# Altium PCB IoT-Button-PCB-v1.5.PcbDoc
Units mil, origin at the board's own origin, x right, y up, seen from the top; angles counter-clockwise.
Board outline 3543.3 x 3267.72 mil, 2 copper layers (Top Layer, Bottom Layer), stack 46.063 mil thick; 41 components, 21 nets, 170 pads, 0 vias.
Unrouted connection lines stored in the file: 71.
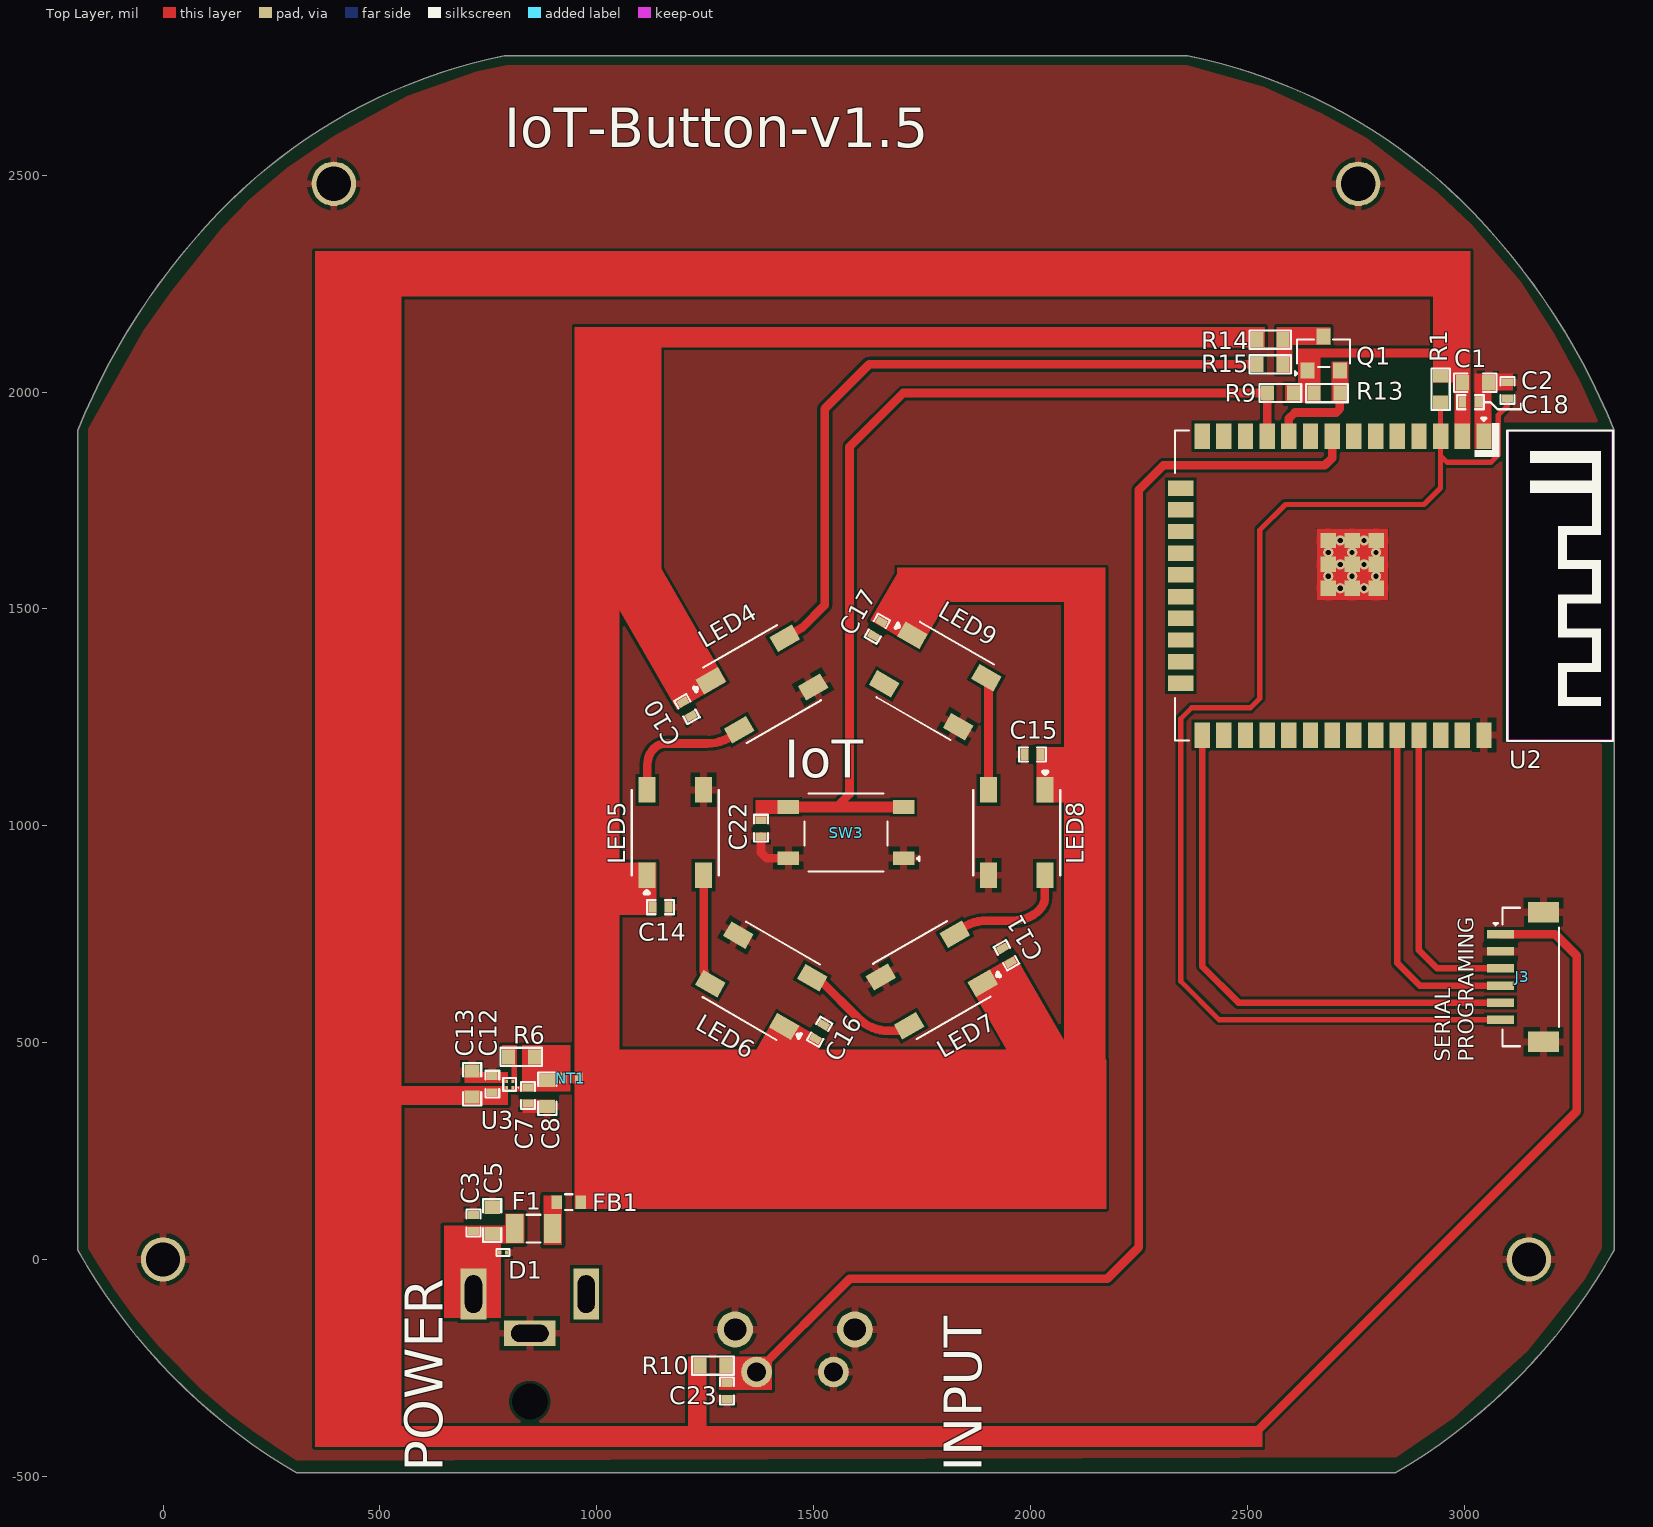
[diagram p0: Top Layer view]
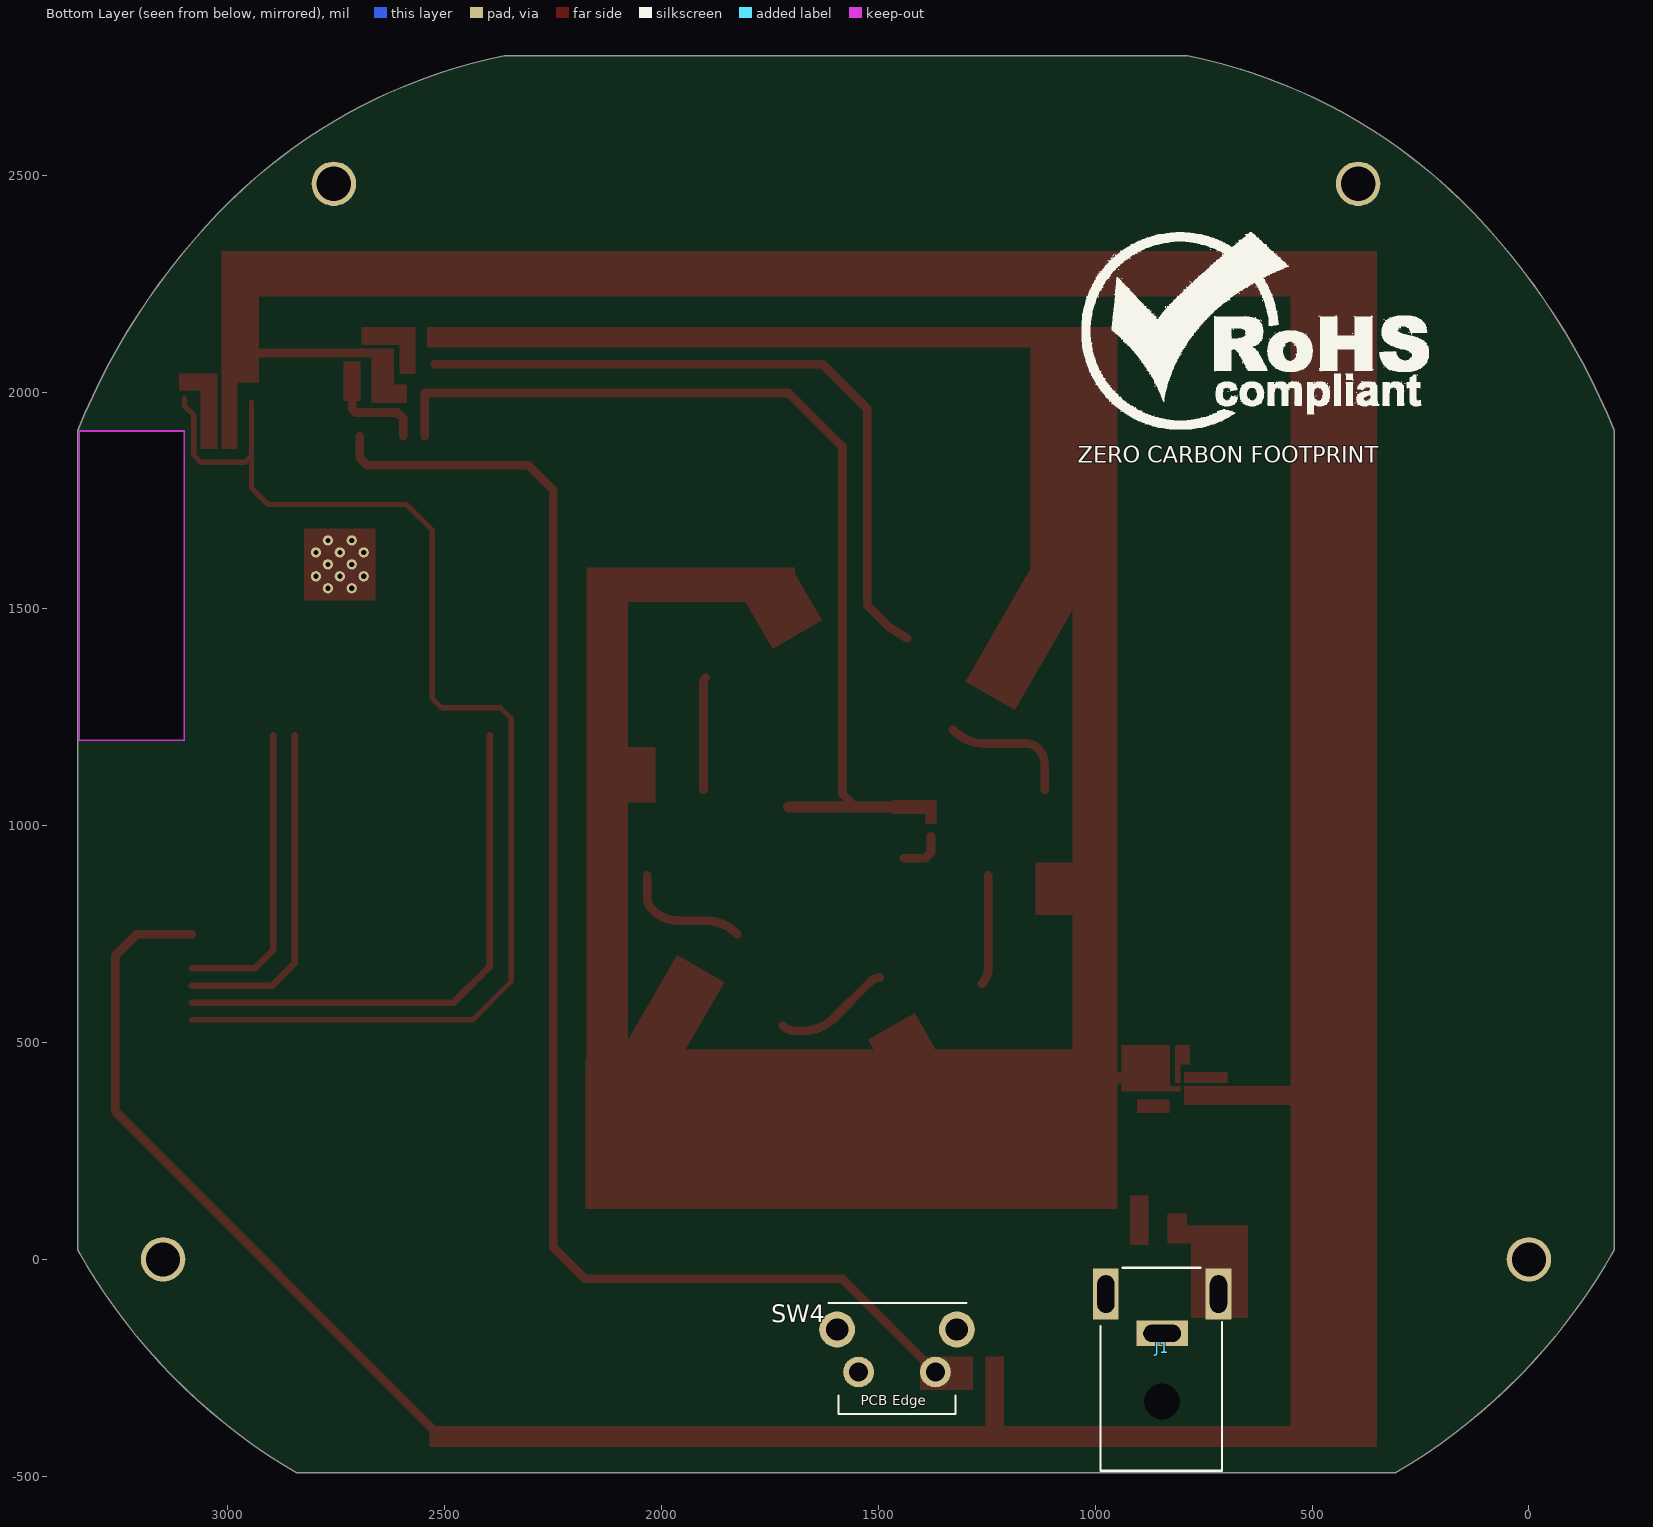
[diagram p1: Bottom Layer view, seen from below]
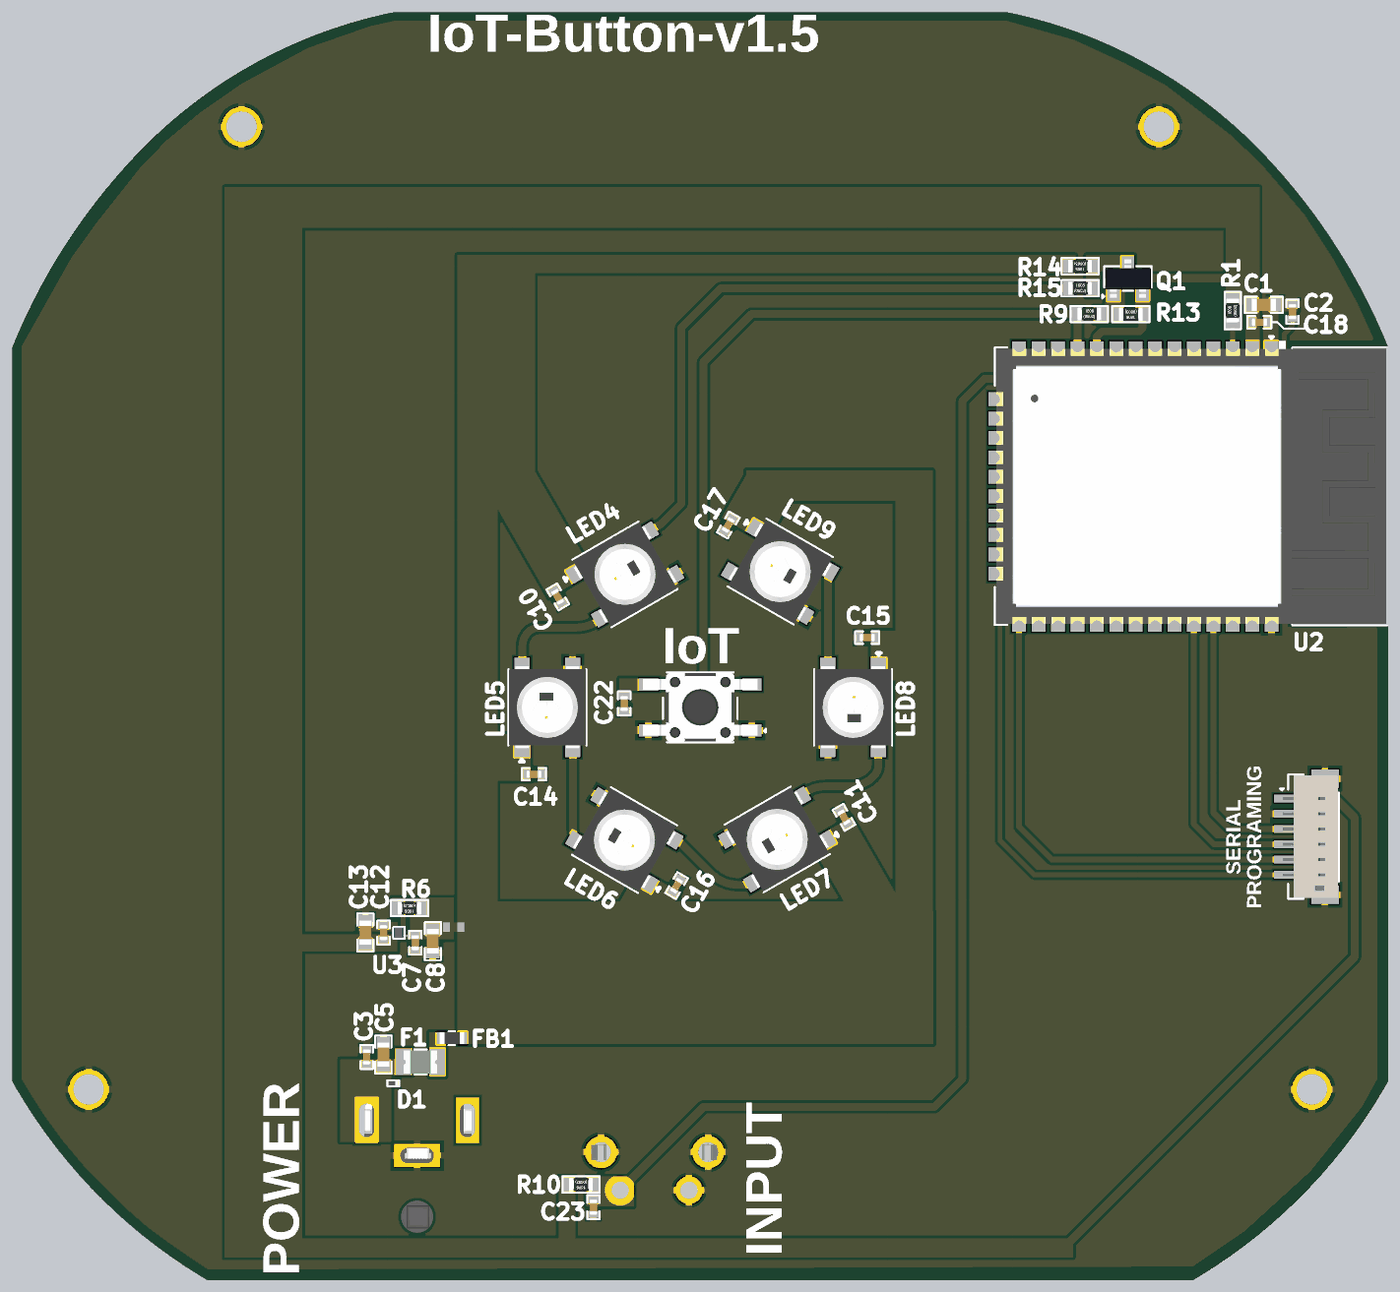
[diagram p2: 3D render of the assembled board from above, using the file's embedded part models]

## Layer stack, top to bottom
Top Solder: solder mask 0.3937, Solder Resist, Dk 3.5
Top Layer: signal copper 1.378
Dielectric 1: dielectric 43.3071, FR-4, Dk 4.8
Bottom Layer: signal copper 1.378
Bottom Solder: solder mask 0.3937, Solder Resist, Dk 3.5

## Board outline
307.28,-492.13 cw(c1004.42,696.47) -196.85,21.41 -196.85,1911.17 cw(c1263.78,1322.48) 127.96,2413.3 cw(c1036.62,1540.64) 787.4,2775.59 2362.2,2775.59 cw(c2112.99,1540.64) 3021.65,2413.3 cw(c1885.82,1322.48) 3346.45,1911.17 3346.46,21.41 cw(c2145.19,696.47) 2842.32,-492.13
cut-out: 3100,1196.74 3100,1910.74 3346.46,1911.17 3346.46,1197.27

## Design rules (kind name [scope] priority, off if disabled: settings)
Clearance [All] p1: gap=7 ignorepadtopadclearanceinfootprint=FALSE
HoleToHoleClearance [All] p1: gap=5 allowstackedmicrovias=TRUE
MinimumSolderMaskSliver [All] p1: minsoldermaskwidth=0
PolygonConnect [All] p1: connectstyle=Relief reliefconductorwidth=17 reliefentries=4 polygonreliefangle="90 Angle" airgapwidth=10
RoutingLayers [All] p1: top layer_v5=TRUE bottom layer_v5=FALSE
RoutingVias [All] p1: holewidth=11.81 width=23.62 viastyle="Through Hole" minholewidth=11.81 minwidth=23.62 maxholewidth=11.81 maxwidth=23.62
SilkToSilkClearance [All] p1: silktosilkclearance=0
SilkToSolderMaskClearance [IsPad] p1: minsilkscreentomaskgap=0 clearancetoexposedcopper=TRUE
SolderMaskExpansion [All] p1: expansion=4 istentingtop=FALSE
UnRoutedNet [All] p1: checkbadconnections=TRUE
Width [All] p1: maxlimit=47.24 minlimit=10 preferedwidth=20 minimp=50.000000 maximp=50.000000 favimp=50.000000
24 further rules are at their usual default settings.

## Classes and differential pairs
component class U_Power-Section: C3 C5 C7 C8 C12 C13 D1 F1 FB1 J1 NT1 R6 U3
component class U_LEDS: C10 C11 C14 C15 C16 C17 LED4 LED5 LED6 LED7 LED8 LED9 Q1 R13 R14 R15
component class U_Controller-Section: C1 C2 C18 C22 C23 J3 R1 R9 R10 SW3 SW4 U2

## Components (designator, comment, footprint, x,y, rotation, side; value= is the part's Value field where it differs from the comment)
C1 "1uF" Cap-0603 3026,2021.5 r180 top
C2 "100nF" Cap-0402 3100,2004 r270 top
C3 "1uF" Cap-0603 759,89.72 r270 top
C5 "100nF" Cap-0402 716,83.72 r270 top
C7 "1uF" Cap-0603 886,382 r90 top
C8 "100nF" Cap-0402 841,377.92 r90 top
C10 "100nF" Cap-0402 1208,1269.02 r120 top
C11 "100nF" Cap-0402 1945,701 r300 top
C12 "100nF" Cap-0402 759.2,404 r270 top
C13 "1uF" Cap-0603 712.5,404 r270 top
C14 "100nF" Cap-0402 1146.83,812 r180 top locked
C15 "100nF" Cap-0402 2004.96,1164 r0 top
C16 "100nF" Cap-0402 1514,524.98 r240 top
C17 "100nF" Cap-0402 1647.14,1454.18 r60 top
C18 "100nF" Cap-0402 3014.5,1976.5 r180 top
C22 "100nF" Cap-0402 1378.94,994.25 r90 top
C23 "100nF" Cap-0402 1299.98,-303.32 r90 top
D1 "PESD5V0H1BSFYL" DSN0603-2 784.13,15.72 r180 top
F1 "BSMD0805L-200" Fuse-0805 854.31,70.72 r0 top
FB1 "BLM18SG121TN1D" "IND-0603 (1608 Metric)" 935.44,132 r180 top
J1 "DC-0360-2.5" DC-0360-2.5 845.7,-170.52 r90 bottom
J3 "Voltlink Target" "Voltlink Target" 3133.77,651.16 r270 top
LED4 "WS2812B-XF02/W" WS2812B-XF02/W 1381.02,1326.96 r30 top
LED5 "WS2812B-XF02/W" WS2812B-XF02/W 1181.1,984.25 r90 top locked
LED6 "WS2812B-XF02/W" WS2812B-XF02/W 1379.57,642.37 r150 top
LED7 "WS2812B-XF02/W" WS2812B-XF02/W 1772.94,644.04 r210 top
LED8 "WS2812B-XF02/W" WS2812B-XF02/W 1968.5,984.25 r270 top locked
LED9 "WS2812B-XF02/W" WS2812B-XF02/W 1780.59,1333.95 r330 top
NT1 "Net Tie_SMD" "Net Tie Pad" 940,418 r180 top net-tie
Q1 "Si2302CDS" Sot-23 2676.12,2088.87 r0 top
R1 "10K" Res-0603 2946,2006.5 r270 top
R6 "10K" Res-0603 826,467 r0 top
R9 "10K" Res-0603 2576.47,1997.75 r180 top
R10 "10K" Res-0603 1267.98,-245 r0 top
R13 "10K" Res-0603 2683.72,1997.5 r0 top
R14 "10K" Res-0603 2553,2121 r0 top
R15 "1K" Res-0603 2553,2064 r180 top
SW3 "GT-TC074E-H080-L1" GT-TC074E-H080-L1 1574.8,984.25 r180 top locked
SW4 "1825027-8" 1825027-8 1457.2,-210.75 r180 bottom
U2 "ESP32-WROOM-32E-N8R2" "38-SMD Module" 2696.39,1553.49 r270 top
U3 "TPS7A2133PYWDJ" "4-WCSP (0.63x0.63)" 798.71,404 r180 top

## Footprints (in the part's own frame and the unit in brackets; to place one, negate y for a bottom-side part, rotate by r counter-clockwise, add the part's x,y. Pads: shape width x height; smd on the part's side, far side on the other; paste and mask are expansions set on the pad)
"4-WCSP (0.63x0.63)" [mm]
  rect 0.165x0.165 smd: A1(-0.192,0.193) A2(0.158,0.193) B1(-0.192,-0.157) B2(0.158,-0.157)
  silkscreen extent -0.54,-0.37 0.36,0.39, body extent -0.32,-0.32 0.32,0.32, height 0.43
"38-SMD Module" [mm]
  rect 1.5x0.9 smd: 1(-8.75,8.88) 2(-8.75,7.61) 3(-8.75,6.34) 4(-8.75,5.07) 5(-8.75,3.8) 6(-8.75,2.53) 7(-8.75,1.26) 8(-8.75,-0.01) 9(-8.75,-1.28) 10(-8.75,-2.55) 11(-8.75,-3.82) 12(-8.75,-5.09) 13(-8.75,-6.36) 14(-8.75,-7.63) 25(8.75,-7.63) 26(8.75,-6.36) 27(8.75,-5.09) 28(8.75,-3.82) 29(8.75,-2.55) 30(8.75,-1.28) 31(8.75,-0.01) 32(8.75,1.26) 33(8.75,2.53) 34(8.75,3.8) 35(8.75,5.07) 36(8.75,6.34) 37(8.75,7.61) 38(8.75,8.88)
  rect 0.9x1.5 smd: 15(-5.71,-8.88) 16(-4.44,-8.88) 17(-3.17,-8.88) 18(-1.9,-8.88) 19(-0.63,-8.88) 20(0.64,-8.88) 21(1.91,-8.88) 22(3.18,-8.88) 23(4.45,-8.88) 24(5.72,-8.88)
  rect 0.9x0.9 smd: 39(-2.65,2.56) 40(-1.25,2.56) 41(0.15,2.56) 42(-2.65,1.16) 43(-1.25,1.16) 44(0.15,1.16) 45(-2.65,-0.24) 46(-1.25,-0.24) 47(0.15,-0.24)
  round 0.6 hole 0.3 mask+0: 39_10(-1.95,2.56) 39_11(-0.55,2.56) 39_12(-2.65,1.86) 39_13(-1.25,1.86) 39_14(0.15,1.86) 39_15(-1.95,1.16) 39_16(-0.55,1.16) 39_17(-2.65,0.46) 39_18(-1.25,0.46) 39_19(0.15,0.46) 39_20(-1.95,-0.24) 39_21(-0.55,-0.24)
  Keep-Out Layer region: -9.043,10.287 9.042,10.287 9.042,16.383 -9.043,16.383
  silkscreen extent -9.8,-9.22 9.09,16.43, body extent -9,-9.12 9,16.38, height 3.25
1825027-8 [mm]
  round 1.8 hole 1.1: 1(-2.25,-1.245) 2(2.25,-1.245)
  round 2.1 hole 1.3: 3(3.505,1.245) 4(-3.505,1.245)
  silkscreen extent -4.01,-3.71 4.06,2.79, body extent -4.18,-7.11 4.23,2.73, height 8
Cap-0402 [mil]
  rect 18x25 smd mask+2.36: 1(-18.5,0) 2(18.5,0)
  silkscreen extent -31,-16 31,16, body extent -20,-10 20,10, height 19
Cap-0603 [mil]
  rect 30x35 smd mask+2.36: 1(-30,0) 2(30,0)
  silkscreen extent -49,-21 49,21, body extent -32,-16 31,16, height 34
DC-0360-2.5 [mm]
  rect 1.5x3 hole 1 slot 2.2 at 90 deg mask+0.05: 2(0,0)
  rect 3x1.5 hole 1 slot 2.2 at 0 deg mask+0.05: 3(2.3,3.3) 4(2.3,-3.3)
  round 0 hole 2.1 unplated mask+0.05: MH(-4,0)
  silkscreen extent -8.05,-3.51 3.84,3.61, body extent -8.01,-3.45 3.79,3.56, height 9.65
DSN0603-2 [mm]
  rect 0.2x0.24 smd mask+0.055: 1(-0.2,0) 2(0.2,0)
  silkscreen extent -0.38,-0.2 0.38,0.2, body extent -0.3,-0.15 0.3,0.15, height 0.32
Fuse-0805 [mm]
  rect 1x1.7 smd: 1(-1.1,0) 2(1.1,0)
  silkscreen extent -0.41,-0.81 0.41,0.81, body extent -1.1,-0.75 1.1,0.75, height 1.24
GT-TC074E-H080-L1 [mm]
  rect 1.25x0.8 smd: 1(-3.375,1.5) 2(3.375,1.5) 3(-3.375,-1.5) 4(3.375,-1.5)
  silkscreen extent -4.29,-2.29 2.44,2.29, body extent -3.75,-2.25 3.75,2.25, height 8
"IND-0603 (1608 Metric)" [mm] "0.063\" L x 0.032\" W (1.60mm x 0.80mm)"
  rect 0.6x0.8 smd: 1(-0.7,0) 2(0.7,0)
  silkscreen extent -0.2,-0.46 0.23,0.46, body extent -0.8,-0.4 0.8,0.4, height 0.78
"Net Tie Pad" [mil]
  rect 18x25 smd mask-10: 1(-18.5,0) 2(18.5,0)
  Top Layer region: -14.97,-12.5 15.03,-12.5 15.03,12.5 -14.97,12.5
Res-0603 [mil]
  rect 30x35 smd: 1(-30,0) 2(30,0)
  silkscreen extent -48,-21 48,21, body extent -31,-17 31,17, height 18
Sot-23 [mm] "TRANS NPN 40V 0.6A SOT23"
  rect 0.82x0.92 smd: 1(-0.95,-1) 2(0.95,-1) 3(0,1)
  silkscreen extent -1.68,-1.3 1.55,0.81, body extent -1.5,-1.25 1.5,1.25, height 1.05
"Voltlink Target" [mm]
  rect 0.5x1.6 smd: 1(-2.5,-1.262) 2(-1.5,-1.262) 3(-0.5,-1.262) 4(0.5,-1.262) 5(1.5,-1.262) 6(2.5,-1.262)
  rect 1.2x1.8 smd: MP1(-3.8,1.262) MP2(3.8,1.262)
  silkscreen extent -4.06,-1.68 4.06,2.17, body extent -4,-1.49 4,2.11, height 4.25
WS2812B-XF02/W [mm]
  rect 1.5x1 smd: 1(-2.5,1.65) 2(-2.5,-1.65) 3(2.5,-1.65) 4(2.5,1.65)
  silkscreen extent -3.56,-2.55 2.5,2.55, body extent -2.7,-2.5 2.7,2.5, height 1.55

## Part data
C1 C3 C7 C13: library part CC0603KRX5R8BB105, "CAP CER 1UF 25V X5R 0603", Case Code (Imperial)=0603, Case Code (Metric)=1608, Dielectric=X5R, LCSC Part Number=C14664, Manufacturer=Yageo, Max Operating Temperature=85°C, Min Operating Temperature=-55°C, Package Quantity=1, Supplier Part Number 1=311-1445-1-ND, Tolerance=10%, Voltage Rating=25V, Capacitance=1uF, Case/Package=0603, Category="Ceramic Capacitors", ComponentLink1Description=https://datasheet.ciiva.com/176/mlccorderingcode-176785.pdf?src-supplier=Digi-Key, ComponentLink1URL=https://datasheet.ciiva.com/176/mlccorderingcode-176785.pdf?src-supplier=Digi-Key, ComponentLink2Description=https://datasheet.ciiva.com/176/mlccorderingcode-176786.pdf?src-supplier=Digi-Key, ComponentLink2URL=https://datasheet.ciiva.com/176/mlccorderingcode-176786.pdf?src-supplier=Digi-Key, ComponentLink3Description=https://datasheet.ciiva.com/176/mlccorderingcode-176787.pdf?src-supplier=Digi-Key, ComponentLink3URL=https://datasheet.ciiva.com/176/mlccorderingcode-176787.pdf?src-supplier=Digi-Key, ComponentLink4Description=https://datasheet.ciiva.com/17436/upy-gphc-x5r-4v-to-50v-12-17436952.pdf?src-supplier=Avnet+Europe, ComponentLink4URL=https://datasheet.ciiva.com/17436/upy-gphc-x5r-4v-to-50v-12-17436952.pdf?src-supplier=Avnet+Europe, ComponentLink5Description=https://datasheet.ciiva.com/7978/1525783-7978171.pdf?src-supplier=Element14, ComponentLink5URL=https://datasheet.ciiva.com/7978/1525783-7978171.pdf?src-supplier=Element14, ComponentLink6Description=https://datasheet.ciiva.com/11586/upy-gphc-x5r-4v-to-50v-12-11586318.pdf?src-supplier=Avnet, ComponentLink6URL=https://datasheet.ciiva.com/11586/upy-gphc-x5r-4v-to-50v-12-11586318.pdf?src-supplier=Avnet, Construction=Flat, Depth=0.8mm, Halogen Free="Halogen Free", Height=0.8mm, Lead Free="Lead Free", Length=1.6mm, Manufacturer Part Number=CC0603KRX5R8BB105, Mount="Surface Mount", Number of Pins=2, Packaging="Tape and Reel", Pricing 1="1=0.12000, 10=0.08400, 50=0.04760, 100=0.03940, 500=0.02764, 1000=0.02288 (USD)", Radiation Hardening=No, REACH SVHC="No SVHC", RoHS=Yes, RoHS Compliant=Yes, Series=CC, Stock 1=919939, Supplier 1=Digi-Key, Termination=SMD/SMT, Thickness=0.035inch, Voltage Rating (DC)=25V, Width=0.031inch
  C3 C7 C13: Item Type=Capacitor
C2 C5 C8 C10 C11 C12 C14 C15 C16 C17 C18 C22 C23: library part CC0402KRX5R8BB104, "CAP CER 0.1UF 25V X5R 0402", Case Code (Imperial)=0402, Case Code (Metric)=1005, Dielectric=X5R, LCSC Part Number=C106256, Manufacturer=Yageo, Max Operating Temperature=85°C, Min Operating Temperature=-55°C, Resistor Type=Ceramic, Supplier Part Number 1=311-1697-1-ND, Tolerance=10%, Voltage Rating=25V, Capacitance=100nF, Case/Package=0402, Category="Ceramic Capacitors", ComponentLink1Description=http://www.mouser.com/ds/2/447/UPY-GPHC_X5R_4V-to-50V_25-1131599.pdf?src-supplier=Mouser, ComponentLink1URL=http://www.mouser.com/ds/2/447/UPY-GPHC_X5R_4V-to-50V_25-1131599.pdf?src-supplier=Mouser, ComponentLink2Description=http://www.yageo.com/documents/recent/UPY-GPHC_X5R_4V-to-50V-16.pdf?src-supplier=Future+Electronics, ComponentLink2URL=http://www.yageo.com/documents/recent/UPY-GPHC_X5R_4V-to-50V-16.pdf?src-supplier=Future+Electronics, ComponentLink3Description=http://www.yageo.com/documents/recent/UPY-GPHC_X5R_4V-to-50V_25.pdf?src-supplier=Digi-Key, ComponentLink3URL=http://www.yageo.com/documents/recent/UPY-GPHC_X5R_4V-to-50V_25.pdf?src-supplier=Digi-Key, Depth=0.5mm, Halogen Free="Halogen Free", Item Type=Capacitor, Lead Free="Lead Free", Length=0.039inch, Manufacturer Part Number=CC0402KRX5R8BB104, Mount="Surface Mount", Packaging="Tape and Reel", Pricing 1="1=0.10000, 10=0.03800, 50=0.02100, 100=0.01710, 500=0.01224, 1000=0.00961, 2500=0.00874, 5000=0.00804 (USD)", RoHS=Yes, RoHS Compliant=Yes, Series=CC, Stock 1=4598218, Supplier 1=Digi-Key, Thickness=0.022inch, Voltage Rating (DC)=25V, Width=0.02inch
D1: "TVS DIODE 5VWM 6.3VC DSN0603-2", LCSC Part Number=C477989, Manufacturer=Nexperia, Category="ESD and Circuit Protection ICs", ComponentLink1Description=http://www.farnell.com/datasheets/1961312.pdf?src-supplier=Farnell, ComponentLink1URL=http://www.farnell.com/datasheets/1961312.pdf?src-supplier=Farnell, ComponentLink2Description=https://assets.nexperia.com/documents/data-sheet/PESD5V0H1BSF.pdf?src-supplier=Digi-Key, ComponentLink2URL=https://assets.nexperia.com/documents/data-sheet/PESD5V0H1BSF.pdf?src-supplier=Digi-Key, ComponentLink3Description=http://www.farnell.com/datasheets/1961312.pdf?src-supplier=Newark, ComponentLink3URL=http://www.farnell.com/datasheets/1961312.pdf?src-supplier=Newark, Item Type=Diode, Manufacturer Part Number=PESD5V0H1BSFYL, Pricing 1="18000=0.06453, 36000=0.06278, 54000=0.06104, 90000=0.05930, 180000=0.05755, 900000=0.05581, 1800000=0.05406 (USD)", RoHS=Yes, RoHS Compliant=Yes, Stock 1=9000, Supplier 1=Avnet, Supplier Part Number 1=PESD5V0H1BSFYL
F1: "6V 2A 50A 1W -40℃~+85℃ 4A 4mΩ 5s 45mΩ 0805 Resettable Fuses ROHS", LCSC Part Number=C2757931, Manufacturer=BHFUSE, Package=0805, ComponentLink1Description=LCSC, ComponentLink1URL=https://www.lcsc.com/product-detail/Resettable-Fuses_BHFUSE-BSMD0805L-200_C2757931.html, Item Type=Fuse, Manufacturer Part Number=BSMD0805L-200
FB1: "FERRITE BEAD 120 OHM 0603 1LN", Case Code (Imperial)=0603, Case Code (Metric)=1608, Current Rating=3A, DC Resistance (DCR)=25mR, Frequency=100MHz, LCSC Part Number=C113030, Manufacturer=Murata, Max Operating Temperature=125°C, Min Operating Temperature=-55°C, Package Quantity=1, Tolerance=25%, Case/Package=0603, Category="Ferrite Beads and Chips", ComponentLink1Description=https://datasheet.ciiva.com/1012/l0110s0100blm18s-1012624.pdf?src-supplier=Digi-Key, ComponentLink1URL=https://datasheet.ciiva.com/1012/l0110s0100blm18s-1012624.pdf?src-supplier=Digi-Key, ComponentLink2Description=https://datasheet.ciiva.com/11799/0900766b811b5866-11799181.pdf?src-supplier=RSComponents, ComponentLink2URL=https://datasheet.ciiva.com/11799/0900766b811b5866-11799181.pdf?src-supplier=RSComponents, ComponentLink3Description=https://datasheet.ciiva.com/18093/getdatasheetpartid-295885-18093249.pdf?src-supplier=Verical, ComponentLink3URL=https://datasheet.ciiva.com/18093/getdatasheetpartid-295885-18093249.pdf?src-supplier=Verical, ComponentLink4Description=https://datasheet.ciiva.com/41449/001171723-da-01-en-chip-drossel0603-120r-3000ma-1-6x0-8mm-41449353.pdf?src-supplier=Conrad, ComponentLink4URL=https://datasheet.ciiva.com/41449/001171723-da-01-en-chip-drossel0603-120r-3000ma-1-6x0-8mm-41449353.pdf?src-supplier=Conrad, ComponentLink5Description=https://datasheet.ciiva.com/41449/001172312-da-01-en-drossel-0603-120r-1-6x0-8mm-10000st-41449675.pdf?src-supplier=Conrad, ComponentLink5URL=https://datasheet.ciiva.com/41449/001172312-da-01-en-drossel-0603-120r-1-6x0-8mm-10000st-41449675.pdf?src-supplier=Conrad, ComponentLink6Description=https://datasheet.ciiva.com/8021/5151-8021511.pdf?src-supplier=Element14, ComponentLink6URL=https://datasheet.ciiva.com/8021/5151-8021511.pdf?src-supplier=Element14, ComponentLink7Description=https://datasheet.ciiva.com/8021/5151-8021512.pdf?src-supplier=Element14, ComponentLink7URL=https://datasheet.ciiva.com/8021/5151-8021512.pdf?src-supplier=Element14, ComponentLink8Description=https://datasheet.ciiva.com/14122/blm-series-eng-tds-14122906.pdf?src-supplier=Distrelec, ComponentLink8URL=https://datasheet.ciiva.com/14122/blm-series-eng-tds-14122906.pdf?src-supplier=Distrelec, ComponentLink9Description=https://datasheet.ciiva.com/1012/l0110s0100blm18s-1012623.pdf?src-supplier=Digi-Key, ComponentLink9URL=https://datasheet.ciiva.com/1012/l0110s0100blm18s-1012623.pdf?src-supplier=Digi-Key, ComponentLink10Description=https://datasheet.ciiva.com/1012/l0110s0100blm18s-1012625.pdf?src-supplier=Digi-Key, ComponentLink10URL=https://datasheet.ciiva.com/1012/l0110s0100blm18s-1012625.pdf?src-supplier=Digi-Key, ComponentLink11Description=https://datasheet.ciiva.com/16395/l0110s0100blm18s-16395498.pdf?src-supplier=Future+Electronics, ComponentLink11URL=https://datasheet.ciiva.com/16395/l0110s0100blm18s-16395498.pdf?src-supplier=Future+Electronics, Core Material=Ferrite, DC Resistance-Max=25mR, Depth=0.8mm, Height=0.8mm, Impedance=120R, Item Type="Ferrite Bead", Lead Free="Lead Free", Length=1.6mm, Manufacturer Part Number=BLM18SG121TN1D, Material=Steel,Ferrite, Max Current Rating=3A, Max DC Current=3A, Number of Circuits=1, Number of Lines=1, Number of Pins=2, Packaging="Tape and Reel", Pricing 1="1=0.12640, 10=0.08350, 25=0.07210, 100=0.05150, 250=0.04730, 500=0.04110, 1000=0.03420, 3000=0.03360, 6000=0.03320, 15000=0.03270, 30000=0.03200, 75000=0.03150 (USD)", Reach SVHC Compliant=Yes, RoHS=Yes, RoHS Compliant=Yes, Series=BLM18S, Shielding=Unshielded, Stock 1=82612, Supplier 1="Arrow Electronics", Supplier Part Number 1=BLM18SG121TN1D, Termination=SMD/SMT, Test Frequency=100MHz, Width=0.8mm
J1: "DC Power Receptacle 260℃ Brass -20℃~+70℃ 2.5mm 6mm 2.5A 24V Plugin AC/DC Power Connectors ROHS", LCSC Part Number=C319122, Manufacturer="XKB Connectivity", Package=Plugin, ComponentLink1Description=LCSC, ComponentLink1URL=https://www.lcsc.com/product-detail/AC-DC-Power-Connectors_XKB-Connectivity-DC-0360-2-5_C319122.html, Item Type="DC Jack", Manufacturer Part Number=DC-0360-2.5
J3: library part C145963, "1x6P SH 1 1mm 6 SMD,P=1mm Wire To Board / Wire To Wire Connector ROHS", Manufacturer=BOOMELE, Package=SMD,P=1mm, ComponentLink1Description=LCSC, ComponentLink1URL=https://www.lcsc.com/product-detail/Wire-To-Board-Wire-To-Wire-Connector_BOOMELE-Boom-Precision-Elec-C145963_C145963.html, Item Type=Connector, LCSC Part Number=C145963, Manufacturer Part Number=C145963
LED4 LED5 LED6 LED7 LED8 LED9: "SMD5050 Light Emitting Diodes (LED) ROHS", LCSC Part Number=C4154882, Manufacturer=Worldsemi, Package=SMD5050, ComponentLink1Description=LCSC, ComponentLink1URL=https://www.lcsc.com/product-detail/Light-Emitting-Diodes-LED_Worldsemi-WS2812B-XF02-W_C4154882.html, Item Type="RGB LED", Manufacturer Part Number=WS2812B-XF02/W
NT1: "Net Tie SMD", Manufacturer Part Number="Net Tie", Item Type="Net Tie Pad"
Q1: "N-CHANNEL 20-V (D-S) MOSFET", LCSC Part Number=C5310968, Manufacturer="TECH PUBLIC", Manufacturer Part Number=SI2302CDS, Package=SOT-23, ComponentLink1Description=LCSC, ComponentLink1URL=https://www.lcsc.com/product-detail/MOSFETs_TECH-PUBLIC-SI2302CDS_C5310968.html, Item Type=Mosfet
R1 R6 R9 R10 R13 R14: library part RC0603FR-0710KL, "RES SMD 10K Ohm 1% 1/10W 0603", Case Code (Imperial)=0603, Case Code (Metric)=1608, LCSC Part Number=C98220, Manufacturer=Yageo, Max Operating Temperature=155°C, Max Power Dissipation=100mW, Min Operating Temperature=-55°C, Resistance=10kR, Resistance Tolerance=1%, Resistor Type="Thick Film", Supplier Part Number 1=311-10.0KHRCT-ND, Temperature Coefficient=100ppm/°C, Voltage Rating=75V, Voltage Rating (DC)=50V, Case/Package=0603, Category="Chip SMD Resistors", ComponentLink1Description=https://datasheet.ciiva.com/7660/38590-7660789.pdf?src-supplier=Element14, ComponentLink1URL=https://datasheet.ciiva.com/7660/38590-7660789.pdf?src-supplier=Element14, ComponentLink2Description=https://datasheet.ciiva.com/7983/443971-7983596.pdf?src-supplier=Element14, ComponentLink2URL=https://datasheet.ciiva.com/7983/443971-7983596.pdf?src-supplier=Element14, ComponentLink3Description=https://datasheet.ciiva.com/22747/443971-22747519.pdf?src-supplier=Element14, ComponentLink3URL=https://datasheet.ciiva.com/22747/443971-22747519.pdf?src-supplier=Element14, ComponentLink4Description=https://datasheet.ciiva.com/46440/1868787-46440891.pdf?src-supplier=Element14, ComponentLink4URL=https://datasheet.ciiva.com/46440/1868787-46440891.pdf?src-supplier=Element14, ComponentLink5Description=https://datasheet.ciiva.com/7746/1738695-7746239.pdf?src-supplier=Element14, ComponentLink5URL=https://datasheet.ciiva.com/7746/1738695-7746239.pdf?src-supplier=Element14, ComponentLink6Description=https://datasheet.ciiva.com/15189/getdatasheetpartid-409289-15189591.pdf?src-supplier=Verical, ComponentLink6URL=https://datasheet.ciiva.com/15189/getdatasheetpartid-409289-15189591.pdf?src-supplier=Verical, Construction=Rectangular, Depth=0.8mm, Features="Moisture Resistant", Height=0.45mm, Item Type=Resistor, Lead Free="Lead Free", Lead Pitch=0.3mm, Length=1.6mm, Manufacturer Part Number=RC0603FR-0710KL, Military Standard=Not, Number of Pins=2, Number of Terminations=2, Packaging="Tape and Reel", Power Rating=100mW, Pricing 1="1=0.10000, 10=0.02400, 100=0.00970, 1000=0.00436, 2500=0.00378 (USD)", REACH SVHC=Unknown, RoHS=Yes, RoHS Compliant=Yes, Series=RC, Size Code=0603, Stock 1=25249139, Supplier 1=Digi-Key, Termination=SMD/SMT, Tolerance=1%, Weight=7.1E-05oz, Width=0.8mm
R15: library part RC0603FR-071KL, "RES SMD 1K OHM 1% 1/10W 0603", Case Code (Imperial)=0603, Case Code (Metric)=1608, LCSC Part Number=C22548, Manufacturer=Yageo, Max Operating Temperature=155°C, Min Operating Temperature=-55°C, Power Rating=100mW, Resistance=1kR, Supplier Part Number 1=311-1.00KHRDKR-ND, Temperature Coefficient=100ppm/°C, Tolerance=1%, Voltage Rating=50V, Case/Package=0603, ComponentLink1Description=https://www.verical.com/server-webapp/html/getDatasheet?partID=409289&src-supplier=Verical, ComponentLink1URL=https://www.verical.com/server-webapp/html/getDatasheet?partID=409289&src-supplier=Verical, ComponentLink2Description=http://documents.rs-components.com/techlib://itc_doclist_GB.htm?stockno=5048928&src-supplier=RSComponents, ComponentLink2URL=http://documents.rs-components.com/techlib://itc_doclist_GB.htm?stockno=5048928&src-supplier=RSComponents, ComponentLink3Description=http://www.yageo.com/documents/recent/PYu-RC0603_51_RoHS_L_4.pdf?src-supplier=Avnet+Europe, ComponentLink3URL=http://www.yageo.com/documents/recent/PYu-RC0603_51_RoHS_L_4.pdf?src-supplier=Avnet+Europe, ComponentLink4Description=http://www.farnell.com/datasheets/2167052.pdf?src-supplier=Element14, ComponentLink4URL=http://www.farnell.com/datasheets/2167052.pdf?src-supplier=Element14, ComponentLink5Description=http://www.farnell.com/datasheets/1868787.pdf?src-supplier=Element14, ComponentLink5URL=http://www.farnell.com/datasheets/1868787.pdf?src-supplier=Element14, ComponentLink6Description=http://www.yageo.com/documents/recent/PYu-RC_Group_51_RoHS_L_2.pdf?src-supplier=Avnet, ComponentLink6URL=http://www.yageo.com/documents/recent/PYu-RC_Group_51_RoHS_L_2.pdf?src-supplier=Avnet, ComponentLink7Description=https://www.verical.com/server-webapp/html/getDatasheet?partID=404327&src-supplier=Verical, ComponentLink7URL=https://www.verical.com/server-webapp/html/getDatasheet?partID=404327&src-supplier=Verical, ComponentLink8Description=http://www.farnell.com/datasheets/443971.pdf?src-supplier=Element14, ComponentLink8URL=http://www.farnell.com/datasheets/443971.pdf?src-supplier=Element14, Composition="Thick Film", Contact Plating=Tin,Matte, Depth=0.8mm, Height=0.45mm, Item Type=Resistor, Lead Free="Lead Free", Length=1.6mm, Manufacturer Part Number=RC0603FR-071KL, Military Standard=Not, Packaging="Tape and Reel", Pricing 1="1=0.1, 10=0.023, 100=0.0094, 1000=0.0042, 2500=0.0037 (USD)", Radiation Hardening=No, REACH SVHC="No SVHC", Stock 1=21472395, Supplier 1=Digi-Key, Termination=SMD/SMT
SW3: "No NO 50mA 100MΩ 100000 Times 12V 130gf@±30gf Brick nogging SPST SMD Tactile Switches ROHS", LCSC Part Number=C963229, Manufacturer=G-Switch, Package=SMD, ComponentLink1Description=LCSC, ComponentLink1URL=https://www.lcsc.com/product-detail/Tactile-Switches_G-Switch-GT-TC074E-H080-L1_C963229.html, Item Type="Tactile Switch", Manufacturer Part Number=GT-TC074E-H080-L1
SW4: "50mA Lying SPST 24V Plugin Tactile Switches ROHS", Manufacturer="TE Connectivity", Category="Pushbutton Switches", ComponentLink1Description=https://datasheet.ciiva.com/30072/eng-cd-1825027-f-30072833.pdf?src-supplier=Onlinecomponents.com, ComponentLink1URL=https://datasheet.ciiva.com/30072/eng-cd-1825027-f-30072833.pdf?src-supplier=Onlinecomponents.com, ComponentLink2Description=https://datasheet.ciiva.com/16393/1825027-8-16393346.pdf?src-supplier=Future+Electronics, ComponentLink2URL=https://datasheet.ciiva.com/16393/1825027-8-16393346.pdf?src-supplier=Future+Electronics, ComponentLink3Description=https://datasheet.ciiva.com/8164/eng-cd-1825027-g4-8164921.pdf?src-supplier=Avnet, ComponentLink3URL=https://datasheet.ciiva.com/8164/eng-cd-1825027-g4-8164921.pdf?src-supplier=Avnet, Manufacturer Part Number=1825027-8, Pricing 1="1=0.13800, 10=0.13370, 25=0.12590, 100=0.10940, 250=0.10570, 500=0.09520, 1000=0.07320, 2500=0.07250, 5000=0.06250 (USD)", RoHS=Yes, Stock 1=178529, Supplier 1="Arrow Electronics", Supplier Part Number 1=1825027-8
U2: "RF TXRX MODULE BT PCB TRACE SMD", LCSC Part Number=C5361945, Manufacturer="Espressif Systems", Supplier Part Number=1965-ESP32-WROOM-32E-N8R2DKR-ND, Category=Uncategorized, Item Type=Module, Manufacturer Part Number=ESP32-WROOM-32E-N8R2, Pricing="1=2.88 (USD)", RoHS=No, Supplier=Digikey
U3: "500-MA, LOW-NOISE, LOW-IQ, HIGH", LCSC Part Number=C3019997, Manufacturer="Texas Instruments", Package=Custom, ComponentLink1Description=LCSC, ComponentLink1URL=https://www.lcsc.com/product-detail/Linear-Voltage-Regulators-LDO_Texas-Instruments-TPS7A2133PYWDJ_C3019997.html, Item Type=IC, Manufacturer Part Number=TPS7A2133PYWDJ

## Free pads (board coordinates)
  round 102.36 hole 78.74 mask+1.97: MH(0,0) MH(393.7,2480.32) MH(2755.91,2480.32) MH(3149.61,0)

## Nets (pads, with @x,y where several pads share a name; then routed paths per layer and width w, separated by ;. In a path a pad name is that pad's centre, name@x,y a point inside that pad or via, vN(x,y) a via of type N, cw(c..) or ccw(c..) an arc to the next point about the centre after c; other vN are vias at no path point)
3.3V: C1.2 C12.2 C13.2 C18.2 J3.1 Q1.1 R1.1 R9.1 R10.1 R13.1 U2.2 U3.A2 | length 1729.6
  Top Layer w20: 1210,-415 1239.9,-415 ; 1239.9,-410.92 1243.98,-415 ; 2510.38,-408.38 3260,341.25 3260,700 3210.42,749.58 J3.1 ; U2.2 C18.2
5VCC: C10.2 C11.2 C14.2 C15.2 C16.2 C17.2 FB1.1 LED4.1 LED5.1 LED6.1 LED7.1 LED8.1 LED9.1 NT1.1 R14.1 | length 7.1
  Top Layer w20: 2121,842 2125,838 ; 2121,2122 2122,2121
5VIN: C3.2 C5.2 D1.2 F1.1 J1.4
BUTTON: C23.2 R10.2 SW4.2 U2.8 | length 3273.4
  Top Layer w20: SW4.2 1583.39,-45 2177.39,-45 2250,27.61 2250,1774 2307,1831 2679,1831 2696,1848 U2.8
DIN: Q1.2 R13.2 U2.10 | length 203.9
  Top Layer w20: U2.10 2596,1939 2610,1953 2705,1953 2713.72,1961.72 R13.2
DIN#: LED4.4 R15.2 | length 1612.7
  Top Layer w20: LED4.4 1450.26,1442.94 1473.17,1456.16 1526,1508.99 1526,1961.57 1628.43,2064 R15.2
DOUT1: LED4.2 LED5.4 | length 307.6
  Top Layer w20: LED5.4@1116.83,1082.68 1116.83,1141.38 cw(c1168.62,1141.38) 1132,1178 cw(c1160.2,1149.8) 1160.2,1189.68 1255.03,1189.68 ccw(c1255.03,1289.68) 1325.74,1218.97 LED4.2
DOUT2: LED5.2 LED6.4 | length 254.5
  Top Layer w20: LED5.2@1246.75,885.83 1246.75,671.77 ccw(c1298.29,671.77) LED6.4
DOUT3: LED6.2 LED7.4 | length 271.1
  Top Layer w20: LED6.2 cw(c1497.28,619.72) 1518.28,640.72 1602.75,556.25 ccw(c1673.46,626.96) 1673.46,526.96 1692.14,526.96 ccw(c1692.14,566.62) LED7.4
DOUT4: LED7.2 LED8.4 | length 293.9
  Top Layer w20: LED7.2 1827.9,751.71 cw(c1898.61,681) 1898.61,781 1960.64,781 ccw(c1960.64,866.36) 2021,806 ccw(c1990.91,836.09) 2033.46,836.09 LED8.4
DOUT5: LED8.2 LED9.4 | length 259.7
  Top Layer w20: LED9.4 cw(c1885.67,1328.36) 1903.54,1328.36 LED8.2
EN: C2.2 J3.6 R1.2 U2.3 | length 2909.6
  Top Layer w12: R1.2 U2.3 2946,1852.82 ; J3.6 2435.27,552.73 2346.79,641.21 2346.79,1246.8 2371.99,1272 2507.43,1272 2529,1293.57 2529,1682 2588,1741 2907.96,1741 2946,1779.04 2946,1852.82 ; C2.2 3100,1968 3079,1947 3079,1855 3062,1838 2960.82,1838 2946,1852.82
GND: C1.1 C2.1 C3.1 C5.1 C7.1 C8.1 C10.1 C11.1 C12.1 C13.1 C14.1 C15.1 C16.1 C17.1 C18.1 C22.1 C23.1 D1.1 J1.2 J3.2 J3.MP1 J3.MP2 LED4.3 LED5.3 LED6.3 LED7.3 LED8.3 LED9.3 pad.MH SW3.1 SW3.2 SW4.1 SW4.3 SW4.4 U2.1 U2.38 U2.39 U2.39_10 U2.39_11 U2.39_12 U2.39_13 U2.39_14 U2.39_15 U2.39_16 U2.39_17 U2.39_18 U2.39_19 U2.39_20 U2.39_21 U2.40 U2.41 U2.42 U2.43 U2.44 U2.45 U2.46 U2.47 U3.B2 | length 245.4
  Top Layer w10: U2.1 3046,1963.5 C18.1 3033,1998.5 C1.1
  Top Layer w20: C22.1 1378.94,938.77 cw(c1377.17,938.77) 1378.42,937.52 1379.4,937.52 1391.72,925.2 SW3.2
IO0: J3.5 U2.25 | length 1255.8
  Top Layer w15: U2.25 2396,1161 2396,676 2479.9,592.1 J3.5
IOT_BUT: C22.2 R9.2 SW3.3 SW3.4 U2.11 | length 2223.4
  Top Layer w20: 1553,1043.31 1583,1073.31 1583,1873.75 1707,1997.75 R9.2 2546.47,1898.45 U2.11
  Top Layer w25: SW3.4 1553,1043.31 SW3.3
NetF1_2: F1.2 FB1.2
NetQ1_3: Q1.3 R14.2 R15.1
NetR6_1: R6.1 U3.B1
RXD: J3.4 U2.34 | length 785.2
  Top Layer w15: U2.34 2846,683.29 2897.82,631.47 J3.4
TXD: J3.3 U2.35 | length 701.5
  Top Layer w15: U2.35 2896,713 2938.16,670.84 2977.51,670.84 2992.01,670.84 J3.3
VIN: C7.2 C8.2 NT1.2 R6.2 U3.A1
pads on no net: J1.3 J1.MH LED9.2 U2.4 U2.5 U2.6 U2.7 U2.9 U2.12 U2.13 U2.14 U2.15 U2.16 U2.17 U2.18 U2.19 U2.20 U2.21 U2.22 U2.23 U2.24 U2.26 U2.27 U2.28 U2.29 U2.30 U2.31 U2.32 U2.33 U2.36 U2.37

## Polygon pours and split planes (outlines as drawn)
GND on Top Layer "NONET_L02_P-001" (solid, remove dead copper, pour order 1): -172.03,1915.69 -172.03,25.92 -144.8,-19.17 -114.03,-67.64 -67.37,-131.4 -8.7,-201.53 89.08,-300.48 153.35,-356.33 207.97,-396.23 255.63,-429.22 308.15,-464.1 2843.29,-456.23 2976.45,-365.41 3145.76,-211.49 3277.97,-46.23 3317.97,25.92 3317.97,1192 3088,1192 3088,1930 3310.59,1930 3267.97,2023.77 3205.53,2138.24 3130.34,2254.26 3017.39,2386.21 2938.52,2460.51 2774.27,2586.57 2667.97,2643.77 2537.97,2703.77 2361.55,2753.77 790.8,2753.77 724.87,2739.4 564.37,2683.15 394.2,2591.33 286.7,2516.71 199.68,2444.25 134.95,2377.73 21.66,2234.7 -44.55,2142.71

## Other copper
Top Layer:
  rectangle net GND: 3024,2004 3112.5,2042.5
  rectangle net GND: 3024,1868.45 3063.72,2042.5
  rectangle net 3.3V: 2978.28,1868.45 3015,2075
  rectangle net 3.3V: 2928.5,2021.5 3015,2301
  rectangle net 3.3V: 2617.47,2079.5 2946,2101
  rectangle net VIN: 827.34,386.75 940,494
  rectangle net NetR6_1: 803.39,406.81 816.31,494
  rectangle net NetR6_1: 781,449 814.17,494
  rectangle net GND: 828.5,337 903.5,368.42
  region net VIN: 908.34,386.75 908.34,399.67 803.04,399.67 803.04,386.75
  region net NetQ1_3: 2568,2150 2568,2108.87 2692.27,2108.87 2692.27,2150
  rectangle net 3.3V: 2617.47,1974.75 2668.72,2101
  rectangle net 3.3V: 2587.47,1974.75 2668.72,2017.75
  rectangle net DIN: 2694.47,1979.72 2733.47,2070.75
  rectangle net NetQ1_3: 2568,2042 2604.35,2146
  region net 5VCC: 949.05,2150 949.05,2103 2541,2103 2541,2150
  rectangle net 3.3V: 350,2220 3015,2325
  rectangle net 3.3V: 1210,-410.92 1252.98,-224.33
  region net 3.3V: 545,-383.75 545,-433 2535,-433 2535,-383.75
  rectangle net 3.3V: 350,-433 550,2251
  region net 5VCC: 2171.66,1595 1692.74,1595 1692.74,1516 2171.66,1516
  rectangle net 5VCC: 951,1516 1148.98,2144
  rectangle net BUTTON: 1281.37,-301.5 1404.05,-224.33
  rectangle net GND: 2659.23,1519.87 2824.9,1685.54
  region net 3.3V: 795.26,386.75 795.26,399.67 545,399.67 545,386.75
  region net 3.3V: 795.17,355.75 795.17,395 500,395 500,355.75
  region net GND: 695,431.5 695,406.95 795.76,406.95 795.76,431.5
  rectangle net 5VCC: 949.05,116.25 2175,461
  rectangle net NetF1_2: 877,32.72 919.69,147.75
  rectangle net 5VIN: 777,36.72 829,77.72
  rectangle net 5VIN: 789,36.72 833,105.72
  rectangle net 5VIN: 647.38,-135.03 779.38,77.72
  region net 5VCC: 2092.94,479.5 1964.33,702.26 1855.25,639.28 1983.86,416.52
  region net 5VCC: 1185.34,1266.27 1299.61,1332.24 1148.98,1593.13 1034.72,1527.16
  region net 5VCC: 1629.94,1473.21 1744.21,1407.24 1807,1516 1692.74,1581.97
  rectangle net IOT_BUT: 1366.45,1027.56 1466.54,1059.06
  rectangle net IOT_BUT: 1366.45,1003.75 1391.45,1059.06
  rectangle net 5VCC: 953,794.5 1137.83,915.35
  region net 5VCC: 2173,484 951,484 951,405.75 2173,405.75
  rectangle net 5VCC: 949.05,406 1053,2128.56
  rectangle net 5VCC: 2077.11,408.25 2173.61,1595
  region net 5VCC: 2173.61,1181.5 2013.78,1181.5 2013.78,1053.15 2173.61,1053.15
  region net 5VCC: 1470.64,414.67 1523.83,506.8 1416.59,568.71 1363.41,476.59

## Silkscreen, mask and mechanical layers (free items; w line width, h text height)
Top Overlay:
  lines w5: 3045.5,1976.5 3061.19,1976.5 3077.19,1960.5 3131.68,1960.5 3131.68,1973
  text "IoT-Button-v1.5" at 786.45,2534.89 h157.48
  text "IoT" at 1432.6,1082.03 h150
  text "SERIAL" at 2979.89,456.24 h60 r90
  text "PROGRAMING" at 3033.4,456.11 h60 r90
  text "POWER" at 673.46,-489.24 h150 r90
  text "INPUT" at 1916.41,-489.24 h150 r90
Bottom Overlay:
  drawing of 3075 lines, arcs and shapes, not listed
  text "ZERO CARBON FOOTPRINT" at 1040.45,1837.25 h38
Deimensions:
  circle w10: c1574.8,984.25 r393.7
  lines w10: 1397.64,-492.13 1515.75,-492.13 ; 1397.64,-489.13 1397.64,-410.39 1515.75,-410.39 1515.75,-489.13 ; 722.96,-414 959.18,-414 959.18,-253.72 722.96,-253.72 722.96,-414 ; 772.17,-488.8 909.97,-488.8 909.97,-414 772.17,-414 772.17,-488.8 ; 1330.71,-410.39 1330.71,-288.34 1566.93,-288.34 1566.93,-410.39 1330.71,-410.39 ; 1456.69,866.14 1456.69,1102.36 1692.91,1102.36 1692.91,866.14 1456.69,866.14 ; 1515.75,984.25 cw(c1574.8,984.25) 1633.86,984.25 cw(c1574.8,984.25) 1515.75,984.25
Board Outline:
  lines w10: 1397.64,-492.13 1515.75,-492.13 ; 3100,1196.56 3100,1910.74 3346.45,1911.17 ccw(c1885.82,1322.48) 3021.65,2413.3 ccw(c2112.99,1540.64) 2362.2,2775.59 787.4,2775.59 ccw(c1036.62,1540.64) 127.96,2413.3 ccw(c1263.78,1322.48) -196.85,1911.17 -196.85,21.41 ccw(c1004.42,696.47) 307.28,-492.13 2842.32,-492.13 ccw(c2145.19,696.47) 3346.46,21.41 3346.45,1197.26 3100,1196.81 ; -39.37,0 cw(c0,0) 39.37,0 cw(c0,0) -39.37,0 ; 354.33,2480.32 ccw(c393.7,2480.32) 433.07,2480.32 ccw(c393.7,2480.32) 354.33,2480.32 ; 2716.54,2480.32 ccw(c2755.91,2480.32) 2795.28,2480.32 ccw(c2755.91,2480.32) 2716.54,2480.32 ; 3110.24,0 cw(c3149.61,0) 3188.98,0 cw(c3149.61,0) 3110.24,0
Fabrication:
  drawing of 191 lines, arcs and shapes, not listed
  text "Layer" at 4027.5,915 h60
  text "Name" at 4437.41,915 h60
  text "Material" at 5367.16,915 h60
  text "Thickness" at 6226.92,915 h60
  text "Constant" at 6876.76,915 h60
  text "Board Layer Stack" at 7446.62,915 h60
  text "Top Overlay" at 4437.41,795 h60
  text "Top Solder" at 4437.41,675 h60
  text "Solder Resist" at 5367.16,675 h60
  text "0.010mm" at 6226.92,675 h60
  text "3.5" at 6876.76,675 h60
  text "1" at 4027.5,555 h60
  text "Top Layer" at 4437.41,555 h60
  text "0.035mm" at 6226.92,555 h60
  text "Dielectric 1" at 4437.41,435 h60
  text "FR-4" at 5367.16,435 h60
  text "1.100mm" at 6226.92,435 h60
  text "4.8" at 6876.76,435 h60
  text "2" at 4027.5,315 h60
  text "Bottom Layer" at 4437.41,315 h60
  text "0.035mm" at 6226.92,315 h60
  text "Bottom Solder" at 4437.41,195 h60
  text "Solder Resist" at 5367.16,195 h60
  text "0.010mm" at 6226.92,195 h60
  text "3.5" at 6876.76,195 h60
  text "Bottom Overlay" at 4437.41,75 h60
  text "Total board thickness:" at 4027.5,-45 h60
  text "1.190mm" at 6226.92,-45 h60
  text "Note:" at 3964.26,-428.01 h200
  text "1.Top layer is only signal layer in PCB" at 3969.26,-568.12 h200
  text "2. PCB thickness would be 1.2mm" at 3964.26,-792.01 h200
Drill Drawing:
  circle w10: c4067.25,1983.33 r33.33
  lines w10: 4033.92,1500 4067.25,1516.67 4100.58,1500 4083.92,1533.33 4100.58,1566.67 4067.25,1550 4033.92,1566.67 4050.58,1533.33 4033.92,1500 ; 4033.92,1666.67 4050.58,1666.67 4067.25,1650 4083.92,1666.67 4100.58,1666.67 4083.92,1683.33 4100.58,1700 4083.92,1700 4067.25,1716.67 4050.58,1700 4033.92,1700 4050.58,1683.33 4033.92,1666.67 ; 4033.92,1816.67 4050.58,1816.67 4050.58,1800 4083.92,1800 4083.92,1816.67 4100.58,1816.67 4100.58,1850 4083.92,1850 4083.92,1866.67 4050.58,1866.67 4050.58,1850 4033.92,1850 4033.92,1816.67 ; 4033.92,2166.67 4100.58,2166.67 4067.25,2100 4033.92,2166.67 ; 4033.92,2250 4100.58,2250 4100.58,2316.67 4033.92,2316.67 4033.92,2250
  lines w15: 3974.12,1455 17062.45,1455 ; 3974.12,2355 17062.45,2355 ; 4525,1305 4525,2505 ; 5064.86,1305 5064.86,2505 ; 6164.54,1305 6164.54,2505 ; 6670.42,1305 6670.42,2505 ; 7404.22,1305 7404.22,2505 ; 8903.77,1305 8903.77,2505 ; 9493.62,1305 9493.62,2505 ; 10239.42,1305 10239.42,2505 ; 11049.19,1305 11049.19,2505 ; 11902.95,1305 11902.95,2505 ; 13236.56,1305 13236.56,2505 ; 14570.17,1305 14570.17,2505 ; 15659.85,1305 15659.85,2505 ; 3974.12,1305 17062.45,1305 17062.45,2505 3974.12,2505 3974.12,1305
  text "Symbol" at 4064.12,2400 h72
  text "Count" at 4570,2400 h72
  text "Hole Size" at 5109.86,2400 h72
  text "Plated" at 6209.54,2400 h72
  text "Hole Type" at 6715.42,2400 h72
  text "Drill Layer Pair" at 7449.22,2400 h72
  text "Via/Pad" at 8948.77,2400 h72
  text "Pad Shape" at 9538.62,2400 h72
  text "Template" at 10284.42,2400 h72
  text "Description" at 11094.19,2400 h72
  text "Hole Tolerance (+)" at 11947.95,2400 h72
  text "Hole Tolerance (-)" at 13281.56,2400 h72
  text "Hole Length" at 14615.17,2400 h72
  text "Routed Path Length" at 15704.85,2400 h72
  text "1" at 4570,2250 h60
  text "2.100mm (82.68mil)" at 5109.86,2250 h60
  text "NPTH" at 6209.54,2250 h60
  text "Round" at 6715.42,2250 h60
  text "Top Layer - Bottom Layer" at 7449.22,2250 h60
  text "Pad" at 8948.77,2250 h60
  text "Rounded" at 9538.62,2250 h60
  text "c0hn210m5" at 10284.42,2250 h60
  text "-" at 14615.17,2250 h60
  text "-" at 15704.85,2250 h60
  text "2" at 4570,2100 h60
  text "1.100mm (43.31mil)" at 5109.86,2100 h60
  text "PTH" at 6209.54,2100 h60
  text "Round" at 6715.42,2100 h60
  text "Top Layer - Bottom Layer" at 7449.22,2100 h60
  text "Pad" at 8948.77,2100 h60
  text "Rounded" at 9538.62,2100 h60
  text "c180h110" at 10284.42,2100 h60
  text "-" at 14615.17,2100 h60
  text "-" at 15704.85,2100 h60
  text "2" at 4570,1950 h60
  text "1.300mm (51.18mil)" at 5109.86,1950 h60
  text "PTH" at 6209.54,1950 h60
  text "Round" at 6715.42,1950 h60
  text "Top Layer - Bottom Layer" at 7449.22,1950 h60
  text "Pad" at 8948.77,1950 h60
  text "Rounded" at 9538.62,1950 h60
  text "c210h130" at 10284.42,1950 h60
  text "-" at 14615.17,1950 h60
  text "-" at 15704.85,1950 h60
  text "3" at 4570,1800 h60
  text "1.000mm (39.37mil)" at 5109.86,1800 h60
  text "PTH" at 6209.54,1800 h60
  text "Slot" at 6715.42,1800 h60
  text "Top Layer - Bottom Layer" at 7449.22,1800 h60
  text "Pad" at 8948.77,1800 h60
  text "Rectangle" at 9538.62,1800 h60
  text "(Mixed)" at 10284.42,1800 h60
  text "2.200mm (86.61mil)" at 14615.17,1800 h60
  text "1.200mm (47.24mil)" at 15704.85,1800 h60
  text "4" at 4570,1650 h60
  text "2.000mm (78.74mil)" at 5109.86,1650 h60
  text "PTH" at 6209.54,1650 h60
  text "Round" at 6715.42,1650 h60
  text "Top Layer - Bottom Layer" at 7449.22,1650 h60
  text "Pad" at 8948.77,1650 h60
  text "Rounded" at 9538.62,1650 h60
  text "c260h200m265" at 10284.42,1650 h60
  text "-" at 14615.17,1650 h60
  text "-" at 15704.85,1650 h60
  text "12" at 4570,1500 h60
  text "0.300mm (11.81mil)" at 5109.86,1500 h60
  text "PTH" at 6209.54,1500 h60
  text "Round" at 6715.42,1500 h60
  text "Top Layer - Bottom Layer" at 7449.22,1500 h60
  text "Pad" at 8948.77,1500 h60
  text "Rounded" at 9538.62,1500 h60
  text "c60h30m0mx0" at 10284.42,1500 h60
  text "-" at 14615.17,1500 h60
  text "-" at 15704.85,1500 h60
  text "24 Total" at 4570,1350 h60
  text "Slot definitions :" at 4064.12,1205.03 h60
  text "Routed Path Length" at 5096.81,1205.03 h60
  text "= Calculated from tool start centre position to tool end centre position." at 6199.48,1205.03 h60
  text "Hole Length" at 5096.81,1105.05 h60
  text "= Routed Path Length + Tool Size = Slot length as defined in the PCB layout" at 5789.61,1105.05 h60

## Dimensions
2368,2784 to 2842.32,-492.13 on Deimensions
3346.46,21.41 to 3346.46,1911.17 on Deimensions
3346.46,21.41 to -196.85,21.41 on Deimensions
287,-494 to 2842.32,-492.13 on Deimensions

## Text inside footprints (layer, text, board x,y; h text height)
SW4: Bottom Overlay "PCB Edge" at 1541.2,-344.34 h39.37